# Altium PCB PCB4.PcbDoc
Units mm, origin at the board's own origin, x right, y up, seen from the top; angles counter-clockwise.
Board outline 150 x 150 mm, 2 copper layers (Top Layer, Bottom Layer); 21 components, 46 nets, 192 pads, 0 vias.
Unrouted connection lines stored in the file: 142.
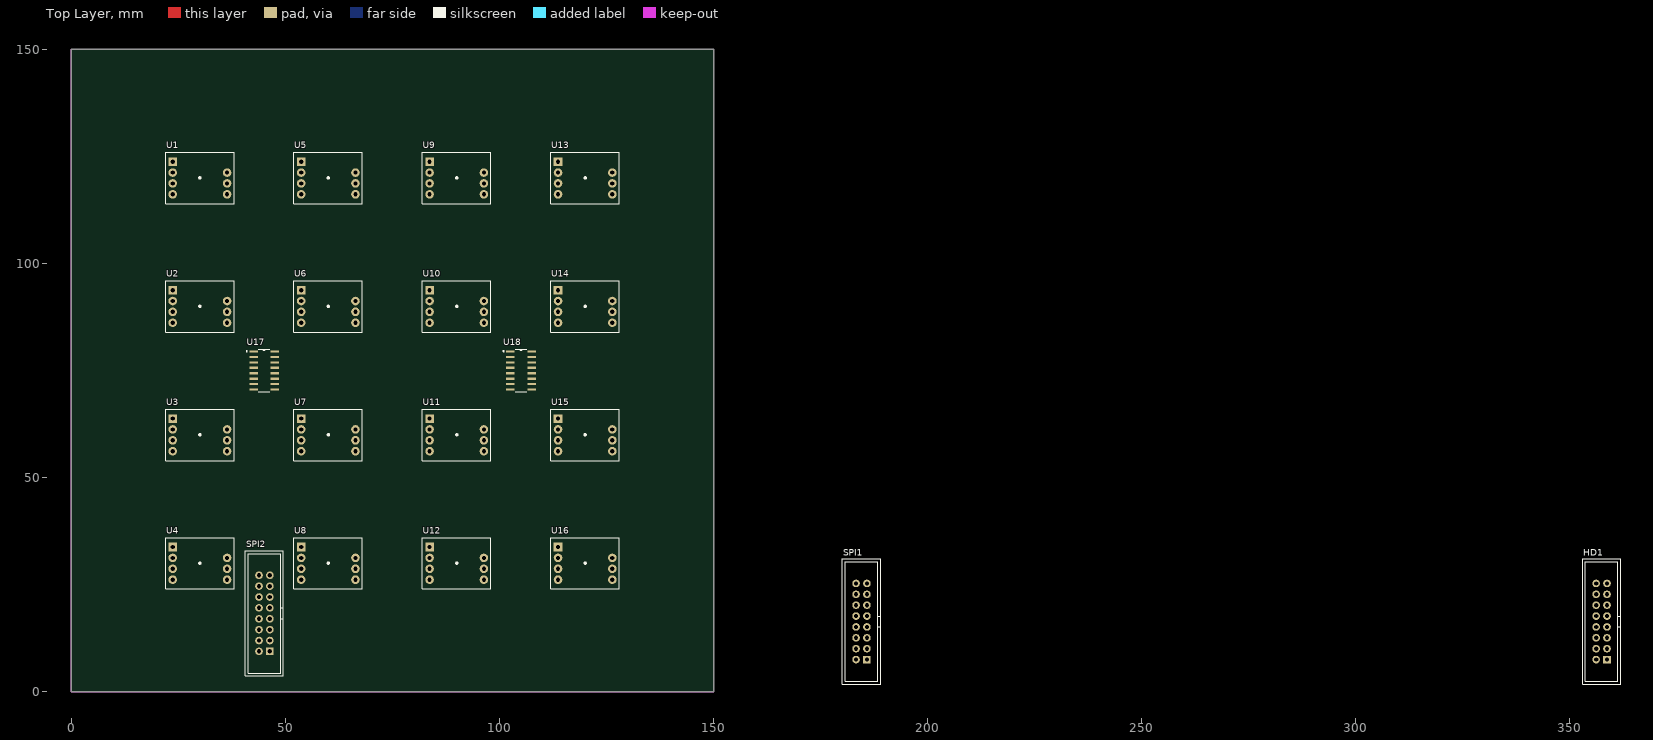
[diagram p0: Top Layer view]
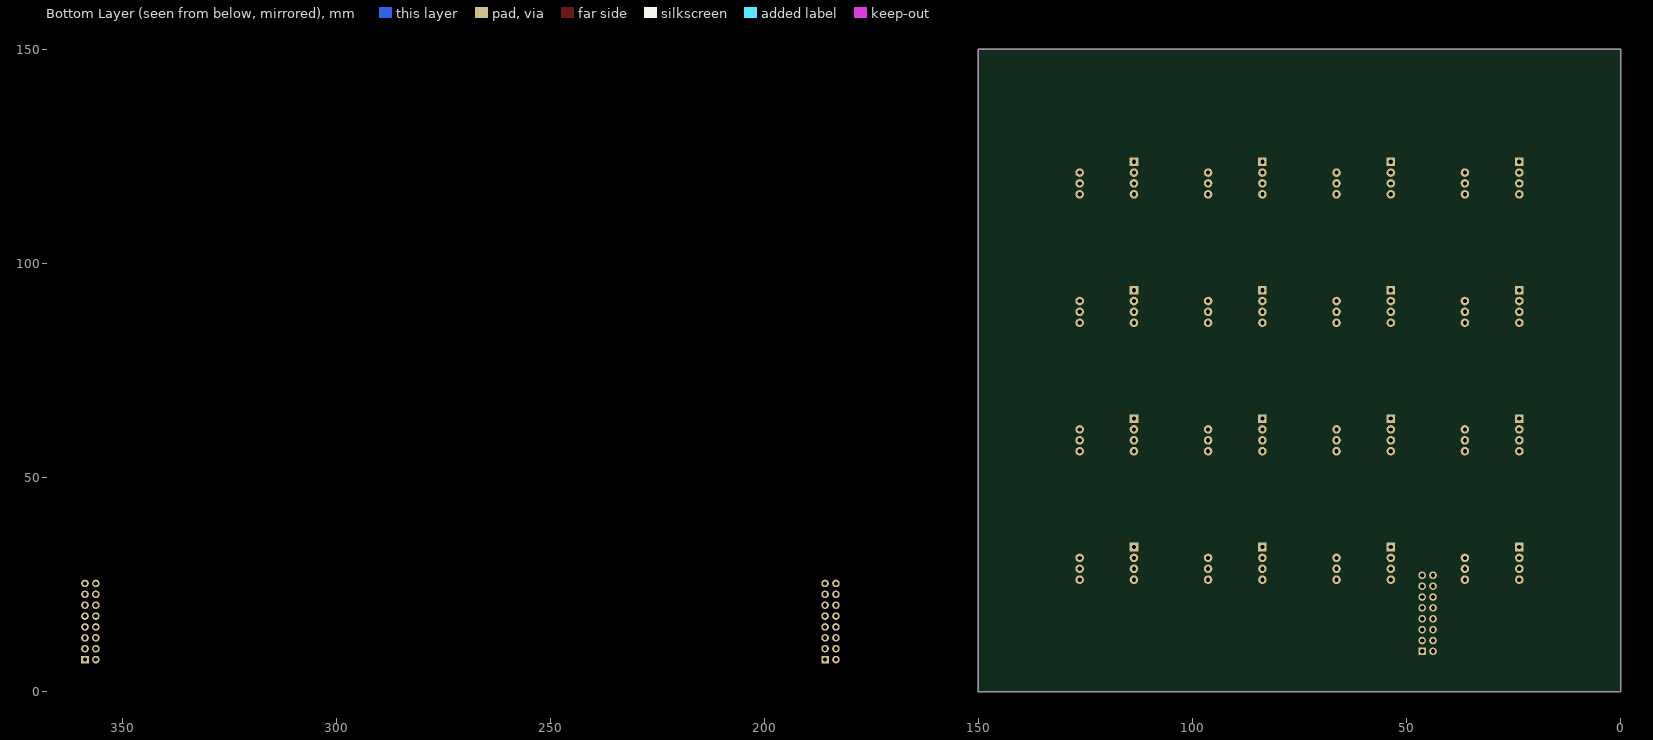
[diagram p1: Bottom Layer view, seen from below]

## Layer stack, top to bottom
Top Solder: solder mask 0.0102, Solder Resist, Dk 3.5
Top Layer: signal copper 0.0356
Dielectric 1: dielectric 0.32, FR-4, Dk 4.8
Bottom Layer: signal copper 0.0356
Bottom Solder: solder mask 0.0102, Solder Resist, Dk 3.5

## Board outline
0,0 0,150 150,150 150,0

## Design rules (kind name [scope] priority, off if disabled: settings)
Clearance [All] p1: gap=0.254 ignorepadtopadclearanceinfootprint=FALSE
PolygonConnect [All] p1: connectstyle=Relief reliefconductorwidth=0.254 reliefentries=4 polygonreliefangle="90 Angle" airgapwidth=0.254
RoutingVias [All] p1: holewidth=0.711 width=1.27 viastyle="Through Hole" minholewidth=0.711 minwidth=1.27 maxholewidth=0.711 maxwidth=1.27
SolderMaskExpansion [All] p1: expansion=0.102 istentingtop=FALSE
Width [All] p1: maxlimit=0.254 minlimit=0.254 preferedwidth=0.254
30 further rules are at their usual default settings.

## Components (designator, comment, footprint, x,y, rotation, side; value= is the part's Value field where it differs from the comment)
HD1 "IDC 8X2" IDC16 358.648,7.493 r90 top value="Header 5x2"
SPI1 "IDC 8X2" IDC16 185.801,7.493 r90 top value="Header 5x2"
SPI2 "IDC 8X2" IDC16 46.355,9.398 r90 top value="Header 5x2"
U1 "TMAG5170_MODULE" "PCBComponent_1 - duplicate" 30,120 r0 top
U2 "TMAG5170_MODULE" "PCBComponent_1 - duplicate" 30,90 r0 top
U3 "TMAG5170_MODULE" "PCBComponent_1 - duplicate" 30,60 r0 top
U4 "TMAG5170_MODULE" "PCBComponent_1 - duplicate" 30,30 r0 top
U5 "TMAG5170_MODULE" "PCBComponent_1 - duplicate" 60,120 r0 top
U6 "TMAG5170_MODULE" "PCBComponent_1 - duplicate" 60,90 r0 top
U7 "TMAG5170_MODULE" "PCBComponent_1 - duplicate" 60,60 r0 top
U8 "TMAG5170_MODULE" "PCBComponent_1 - duplicate" 60,30 r0 top
U9 "TMAG5170_MODULE" "PCBComponent_1 - duplicate" 90,120 r0 top
U10 "TMAG5170_MODULE" "PCBComponent_1 - duplicate" 90,90 r0 top
U11 "TMAG5170_MODULE" "PCBComponent_1 - duplicate" 90,60 r0 top
U12 "TMAG5170_MODULE" "PCBComponent_1 - duplicate" 90,30 r0 top
U13 "TMAG5170_MODULE" "PCBComponent_1 - duplicate" 120,120 r0 top
U14 "TMAG5170_MODULE" "PCBComponent_1 - duplicate" 120,90 r0 top
U15 "TMAG5170_MODULE" "PCBComponent_1 - duplicate" 120,60 r0 top
U16 "TMAG5170_MODULE" "PCBComponent_1 - duplicate" 120,30 r0 top
U17 "SN74LVC138AD" SOIC127P600X175-16N 45,75 r0 top
U18 "SN74LVC138AD" SOIC127P600X175-16N 105,75 r0 top

## Footprints (in the part's own frame and the unit in brackets; to place one, negate y for a bottom-side part, rotate by r counter-clockwise, add the part's x,y. Pads: shape width x height; smd on the part's side, far side on the other; paste and mask are expansions set on the pad)
IDC16 [mil]
  rect 70x70 hole 40: 1(0,0)
  round 70 hole 40: 2(0,100) 3(100,0) 4(100,100) 5(200,0) 6(200,100) 7(300,0) 8(300,100) 9(400,0) 10(400,100) 11(500,0) 12(500,100) 13(600,0) 14(600,100) 15(700,0) 16(700,100)
  silkscreen extent -225,-125 925,225, body extent -225,-125 926,225, height 358
"PCBComponent_1 - duplicate" [mm]
  rect 2x2 hole 1 mask+0.05: 1(-6.35,3.778)
  round 2 hole 1 mask+0.05: 2(-6.35,1.238) 3(-6.35,-1.302) 4(-6.35,-3.842) 5(6.35,-3.842) 6(6.35,-1.302) 7(6.35,1.238)
  silkscreen extent -8.03,-6.02 7.98,6
SOIC127P600X175-16N [mil]
  rect 78x20 smd: 1(-97,175) 2(-97,125) 3(-97,75) 4(-97,25) 5(-97,-25) 6(-97,-75) 7(-97,-125) 8(-97,-175) 9(97,-175) 10(97,-125) 11(97,-75) 12(97,-25) 13(97,25) 14(97,75) 15(97,125) 16(97,175)
  silkscreen extent -166,-197 52,197, body extent -118,-195 118,195, height 69

## Part data
HD1 SPI1 SPI2: library part "IDC 8x2"
U1 U2 U3 U4 U5 U6 U7 U8 U9 U10 U11 U12 U13 U14 U15 U16: "Module TMAG5170 Hall sensor"
U17 U18: "3-Line To 8-Line decoder/Demultiplexer", Package="SOIC-16 Texas Instruments", Check_prices=https://www.snapeda.com/parts/SN74LVC138AD/Texas+Instruments/view-part/?ref=eda, MF="Texas Instruments", MP=SN74LVC138AD, SnapEDA_Link=https://www.snapeda.com/parts/SN74LVC138AD/Texas+Instruments/view-part/?ref=snap

## Nets (pads, with @x,y where several pads share a name; then routed paths per layer and width w, separated by ;. In a path a pad name is that pad's centre, name@x,y a point inside that pad or via, vN(x,y) a via of type N, cw(c..) or ccw(c..) an arc to the next point about the centre after c; other vN are vias at no path point)
3V3: SPI1.1 SPI1.2 SPI2.1 SPI2.2 U1.5 U2.5 U3.5 U4.5 U5.5 U6.5 U7.5 U8.5 U9.5 U10.5 U11.5 U12.5 U13.5 U14.5 U15.5 U16.5 U17.6 U17.16 U18.6 U18.16
A1: SPI1.4 U17.1
A2: SPI2.4 U18.1
AL1: HD1.1 U1.6
AL2: HD1.3 U2.6
AL3: HD1.2 U3.6
AL4: HD1.4 U4.6
AL5: HD1.5 U5.6
AL6: HD1.7 U6.6
AL7: HD1.6 U7.6
AL8: HD1.8 U8.6
AL9: HD1.9 U9.6
AL10: HD1.11 U10.6
AL11: HD1.10 U11.6
AL12: HD1.12 U12.6
AL13: HD1.13 U13.6
AL14: HD1.15 U14.6
AL15: HD1.14 U15.6
AL16: HD1.16 U16.6
B1: SPI1.8 U17.2
B2: SPI2.8 U18.2
C1: SPI1.12 U17.3
C2: SPI2.12 U18.3
GND: SPI1.5 SPI1.6 SPI1.9 SPI1.10 SPI1.13 SPI1.14 SPI2.5 SPI2.6 SPI2.9 SPI2.10 SPI2.13 SPI2.14 U1.7 U2.7 U3.7 U4.7 U5.7 U6.7 U7.7 U8.7 U9.7 U10.7 U11.7 U12.7 U13.7 U14.7 U15.7 U16.7 U17.4 U17.5 U17.8 U18.4 U18.5 U18.8
SENS1: U1.4 U17.15
SENS2: U2.4 U17.14
SENS3: U3.4 U17.13
SENS4: U4.4 U17.12
SENS5: U5.4 U17.11
SENS6: U6.4 U17.10
SENS7: U7.4 U17.9
SENS8: U8.4 U17.7
SENS9: U9.4 U18.15
SENS10: U10.4 U18.14
SENS11: U11.4 U18.13
SENS12: U12.4 U18.12
SENS13: U13.4 U18.11
SENS14: U14.4 U18.10
SENS15: U15.4 U18.9
SENS16: U16.4 U18.7
SPI1_MISO: SPI1.7 U1.3 U2.3 U3.3 U4.3 U5.3 U6.3 U7.3 U8.3
SPI1_MOSI: SPI1.3 U1.2 U2.2 U3.2 U4.2 U5.2 U6.2 U7.2 U8.2
SPI1_SCK: SPI1.11 U1.1 U2.1 U3.1 U4.1 U5.1 U6.1 U7.1 U8.1
SPI2_MISO: SPI2.7 U9.3 U10.3 U11.3 U12.3 U13.3 U14.3 U15.3 U16.3
SPI2_MOSI: SPI2.3 U9.2 U10.2 U11.2 U12.2 U13.2 U14.2 U15.2 U16.2
SPI2_SCK: SPI2.11 U9.1 U10.1 U11.1 U12.1 U13.1 U14.1 U15.1 U16.1
pads on no net: SPI1.15 SPI1.16 SPI2.15 SPI2.16

## Keep-outs
Keep-Out Layer:
  the board outline again, w0.254